# Altium PCB PCB1.PcbDoc
Units mm, origin at the board's own origin, x right, y up, seen from the top; angles counter-clockwise.
Board outline 85 x 70 mm, 2 copper layers (Top Layer, Bottom Layer); 91 components, 72 nets, 366 pads, 207 vias.
Unrouted connection lines stored in the file: 22.
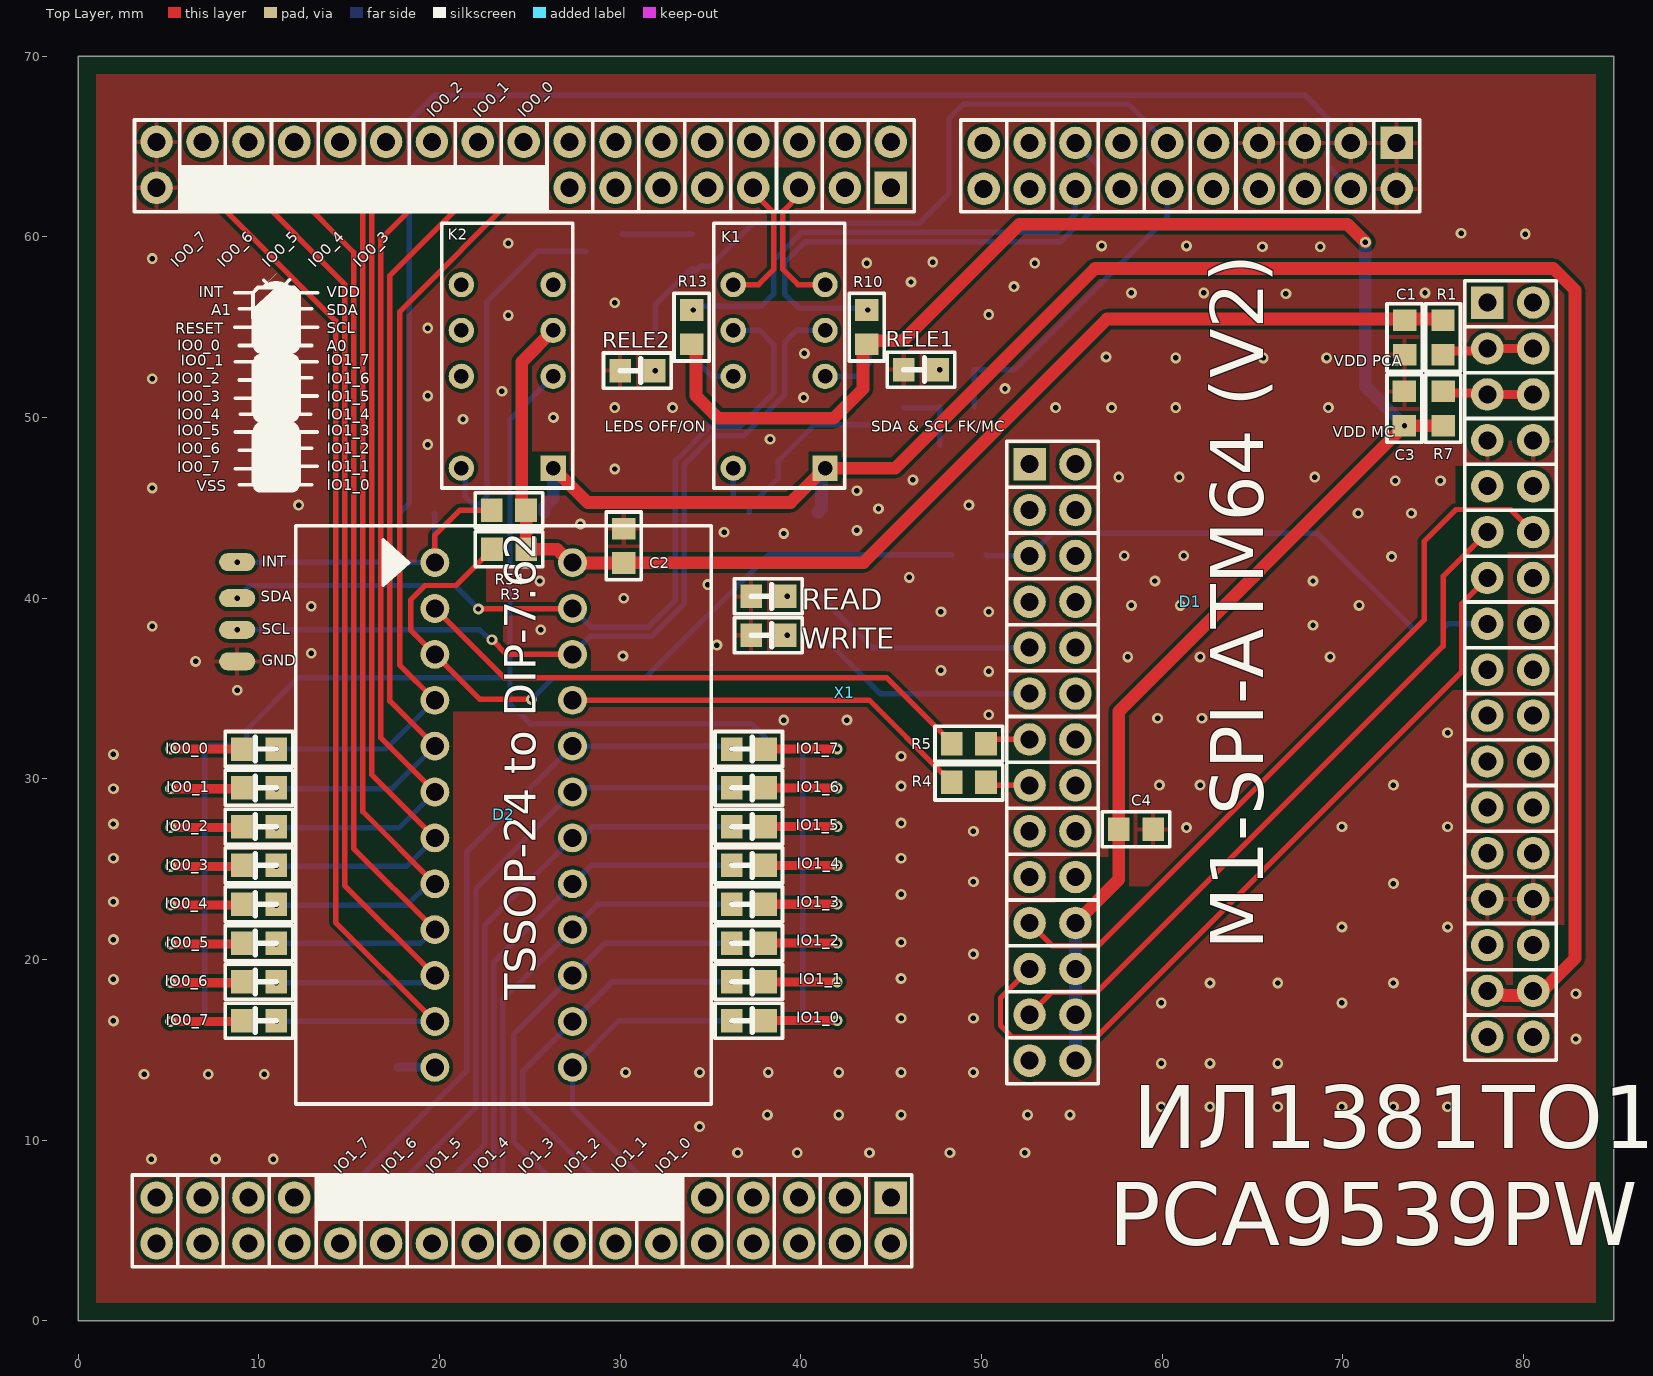
[diagram p0: Top Layer view]
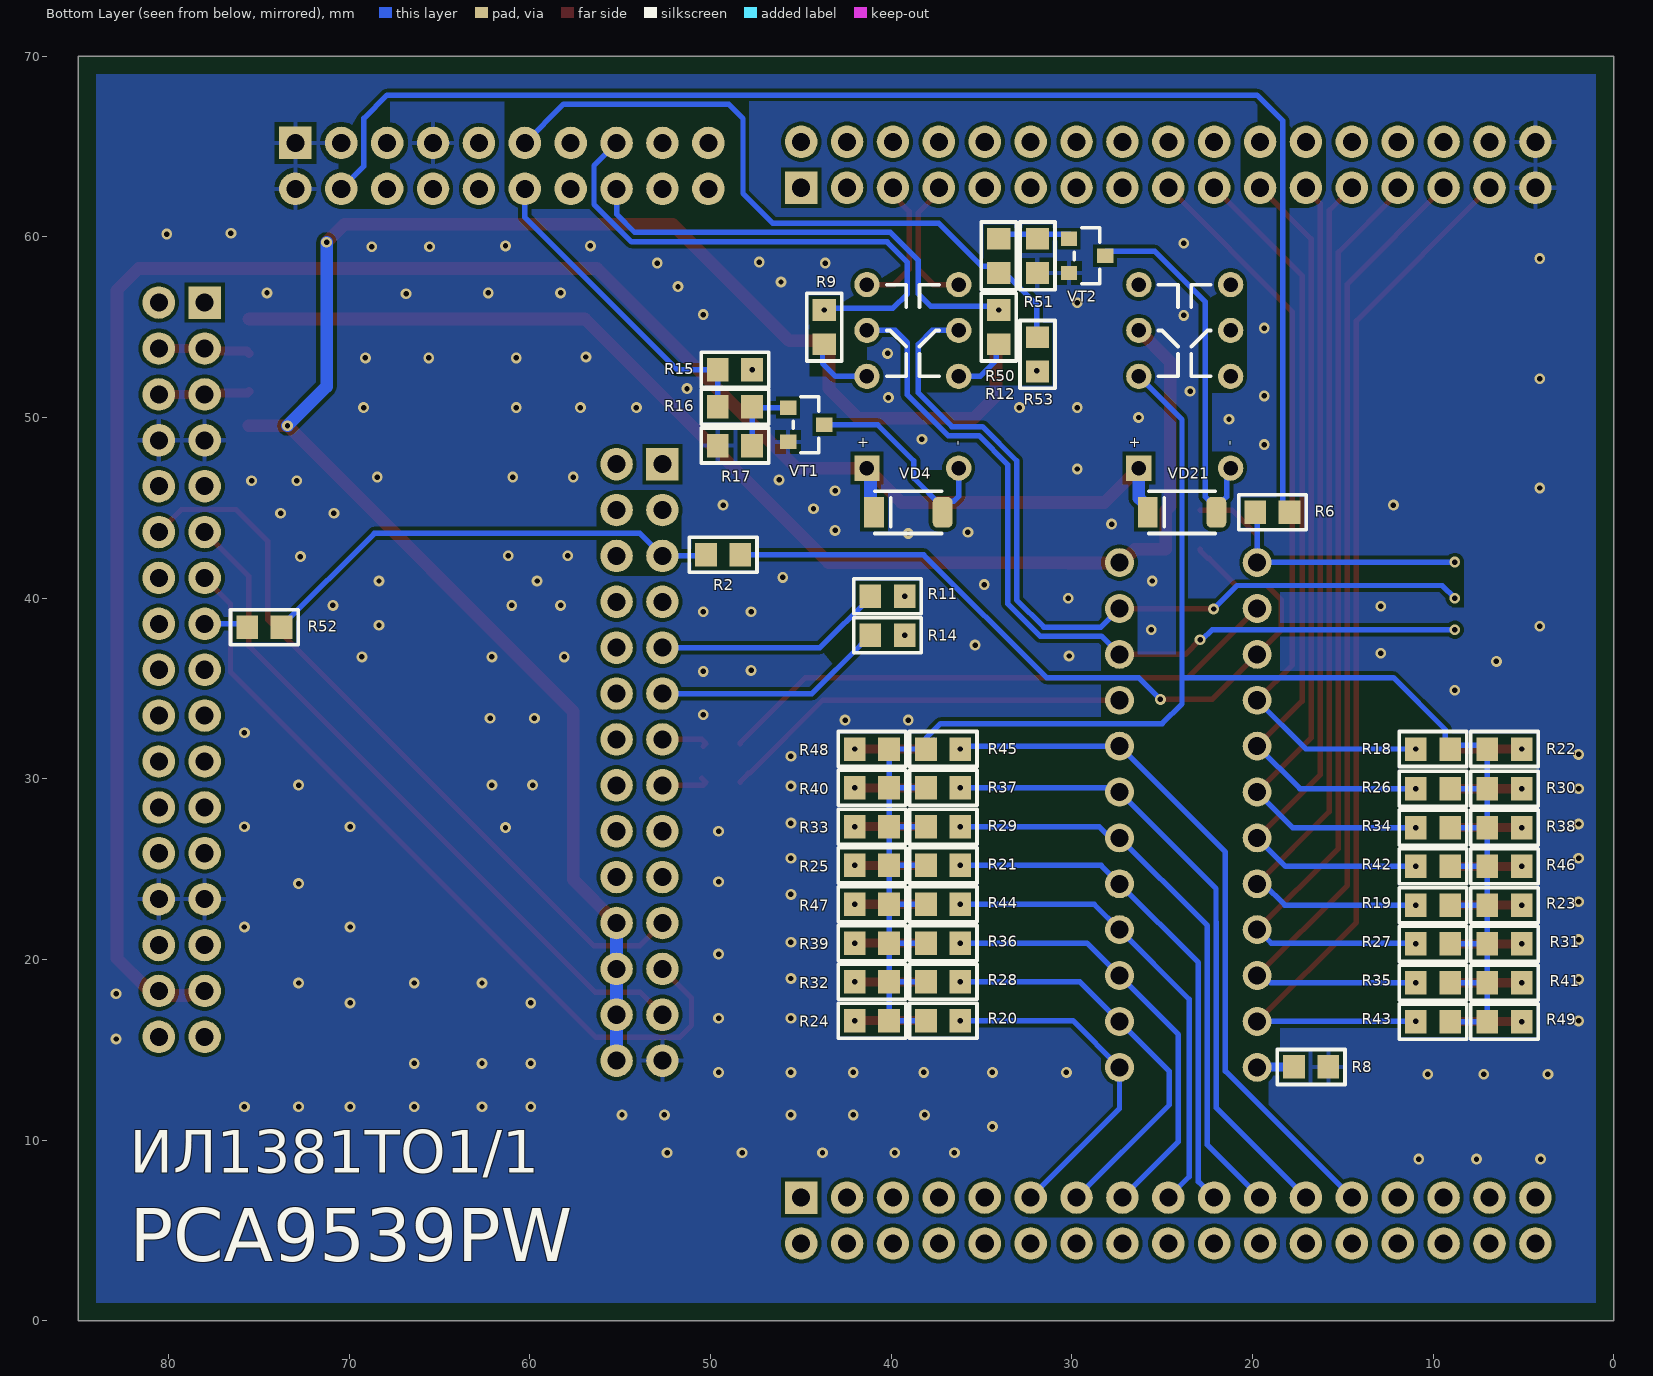
[diagram p1: Bottom Layer view, seen from below]

## Layer stack, top to bottom
Top Solder: solder mask 0.0102, Solder Resist, Dk 3.5
Top Layer: signal copper 0.0356
Dielectric 1: dielectric 0.32, FR-4, Dk 4.8
Bottom Layer: signal copper 0.0356
Bottom Solder: solder mask 0.0102, Solder Resist, Dk 3.5

## Board outline
0,0 85,0 85,70 0,70

## Design rules (kind name [scope] priority, off if disabled: settings)
Clearance [All] p1: gap=0.2 ignorepadtopadclearanceinfootprint=FALSE except(0: Arc-Hole Track-Hole SMDPad-Hole THPad-Hole Via-Hole Fill-Hole Poly-Hole Region-Hole Text-Hole)
ComponentClearance [All] p1: gap=0 collisioncheckmode=3 verticalgap=0 showdistances=FALSE
PolygonConnect [InNet('GND')] p1: thpad.connectstyle=Relief thpad.reliefconductorwidth=0.254 thpad.reliefentries=4 thpad.polygonreliefangle="90 Angle" thpad.airgapwidth=0.254 smdpad.connectstyle=Relief smdpad.reliefconductorwidth=0.254 smdpad.reliefentries=4 smdpad.polygonreliefangle="90 Angle" smdpad.airgapwidth=0.254 via.connectstyle=Direct via.reliefconductorwidth=0.254 via.reliefentries=4 via.polygonreliefangle="90 Angle" via.airgapwidth=0.254
RoutingVias [All] p1: holewidth=0.3 width=0.6 viastyle="Through Hole" minholewidth=0.3 minwidth=0.6 maxholewidth=1.2 maxwidth=2.4
SilkToSilkClearance [All] p1: silktosilkclearance=0
SilkToSolderMaskClearance [IsPad] p1: minsilkscreentomaskgap=0 clearancetoexposedcopper=TRUE
SolderMaskExpansion [All] p1: expansion=0.102 istentingtop=FALSE
Width [All] p1: maxlimit=1.2 minlimit=0.3 preferedwidth=0.3
27 further rules are at their usual default settings.

## Components (designator, comment, footprint, x,y, rotation, side; value= is the part's Value field where it differs from the comment)
C1 "10uF" 0805 73.419,54.432 r270 top
C2 "0.1uF" 0805 30.2,42.9 r90 top
C3 "10uF" 0805 73.414,50.498 r90 top
C4 "0.1uF" 0805 58.55,27.2 r0 top
D1 "M1-SPI-ATM64(V2)" M1-SPI-ATM64(V2) 61.55,39.8 r270 top locked
D2 "PCA9539PW (TSSOP-24)" "PCA9539 (TSSSOP-24 ZIF)" 23.55,28 r0 top locked
GND "Contact" Contact 8.8,36.5 r180 top (schematic designator KP4)
INT "Contact" Contact 8.8,42 r180 top (schematic designator KP1)
IO0_0 "LED(0805)" 0805(LED) 10.006,31.65 r0 top (schematic designator VD5)
IO0_1 "LED(0805)" 0805(LED) 10.006,29.502 r0 top (schematic designator VD9)
IO0_2 "LED(0805)" 0805(LED) 10.006,27.354 r0 top (schematic designator VD13)
IO0_3 "LED(0805)" 0805(LED) 10.006,25.206 r0 top (schematic designator VD17)
IO0_4 "LED(0805)" 0805(LED) 10.006,23.058 r0 top (schematic designator VD6)
IO0_5 "LED(0805)" 0805(LED) 10.006,20.91 r0 top (schematic designator VD10)
IO0_6 "LED(0805)" 0805(LED) 10.006,18.762 r0 top (schematic designator VD14)
IO0_7 "LED(0805)" 0805(LED) 10.006,16.614 r0 top (schematic designator VD18)
IO1_0 "LED(0805)" 0805(LED) 37.117,16.614 r180 top (schematic designator VD7)
IO1_1 "LED(0805)" 0805(LED) 37.117,18.762 r180 top (schematic designator VD11)
IO1_2 "LED(0805)" 0805(LED) 37.117,20.91 r180 top (schematic designator VD15)
IO1_3 "LED(0805)" 0805(LED) 37.117,23.058 r180 top (schematic designator VD19)
IO1_4 "LED(0805)" 0805(LED) 37.117,25.206 r180 top (schematic designator VD8)
IO1_5 "LED(0805)" 0805(LED) 37.117,27.354 r180 top (schematic designator VD12)
IO1_6 "LED(0805)" 0805(LED) 37.117,29.502 r180 top (schematic designator VD16)
IO1_7 "LED(0805)" 0805(LED) 37.117,31.65 r180 top (schematic designator VD20)
K1 "V23079A1001B301 TE" V23079A1001B301 38.8,53.5 r90 top locked
K2 "V23079A1001B301 TE" V23079A1001B301 23.75,53.5 r90 top locked
R1 "1" 0805 75.546,54.427 r90 top
R2 "1" 0805 49.3,42.4 r180 bottom
R3 "10k" 0805 23.85,42.7 r0 top
R4 "1" 0805 49.3,29.8 r0 top
R5 "1" 0805 49.3,31.95 r0 top
R6 "1" 0805 18.9,44.75 r0 bottom
R7 "1" 0805 75.55,50.5 r270 top
R8 "1" 0805 16.75,14.05 r0 bottom
R9 "100" 0805 43.7,55 r90 bottom
R10 "10k" 0805 43.65,55 r270 top
R11 "2.2k" 0805 40.2,40.1 r180 bottom
R12 "100" 0805 34.05,55 r90 bottom
R13 "10k" 0805 33.95,55 r270 top
R14 "2.2k" 0805 40.2,37.95 r180 bottom
R15 "2.2k" 0805 48.65,52.65 r180 bottom
R16 "4.7k" 0805 48.65,50.6 r180 bottom
R17 "20k" 0805 48.65,48.45 r0 bottom
R18 "100k" 0805 10.006,31.65 r0 bottom
R19 "100k" 0805 10.006,23.008 r0 bottom
R20 "100k" 0805 37.117,16.614 r180 bottom
R21 "100k" 0805 37.117,25.206 r180 bottom
R22 "2.2k" 0805 6.051,31.65 r180 bottom
R23 "2.2k" 0805 6.051,23.008 r180 bottom
R24 "2.2k" 0805 41.067,16.614 r0 bottom
R25 "2.2k" 0805 41.067,25.206 r0 bottom
R26 "100k" 0805 10.006,29.452 r0 bottom
R27 "100k" 0805 10.006,20.86 r0 bottom
R28 "100k" 0805 37.117,18.762 r180 bottom
R29 "100k" 0805 37.117,27.354 r180 bottom
R30 "2.2k" 0805 6.051,29.452 r180 bottom
R31 "2.2k" 0805 6.051,20.86 r180 bottom
R32 "2.2k" 0805 41.067,18.762 r0 bottom
R33 "2.2k" 0805 41.067,27.354 r0 bottom
R34 "100k" 0805 10.006,27.304 r0 bottom
R35 "100k" 0805 10.006,18.712 r0 bottom
R36 "100k" 0805 37.117,20.91 r180 bottom
R37 "100k" 0805 37.117,29.502 r180 bottom
R38 "2.2k" 0805 6.051,27.304 r180 bottom
R39 "2.2k" 0805 41.067,20.91 r0 bottom
R40 "2.2k" 0805 41.067,29.502 r0 bottom
R41 "2.2k" 0805 6.051,18.712 r180 bottom
R42 "100k" 0805 10.006,25.156 r0 bottom
R43 "100k" 0805 10.006,16.564 r0 bottom
R44 "100k" 0805 37.117,23.058 r180 bottom
R45 "100k" 0805 37.117,31.65 r180 bottom
R46 "2.2k" 0805 6.051,25.156 r180 bottom
R47 "2.2k" 0805 41.067,23.058 r0 bottom
R48 "2.2k" 0805 41.067,31.65 r0 bottom
R49 "2.2k" 0805 6.051,16.564 r180 bottom
R50 "4.7k" 0805 34.05,58.95 r90 bottom
R51 "20k" 0805 31.9,58.95 r270 bottom
R52 "1" 0805 74.7,38.4 r0 bottom
R53 "2.2k" 0805 31.9,53.5 r270 bottom
R54 "10k" 0805 23.839,44.858 r0 top
READ "LED(0805)" 0805(LED) 38.2,40.1 r180 top (schematic designator VD1)
RELE1 "LED(0805)" 0805(LED) 46.647,52.65 r180 top (schematic designator VD3)
RELE2 "LED(0805)" 0805(LED) 30.95,52.6 r180 top (schematic designator VD22)
SCL "Contact" Contact 8.8,38.25 r180 top (schematic designator KP2)
SDA "Contact" Contact 8.8,40 r180 top (schematic designator KP3)
VD4 "LL4148 NXP" SOD80C 39.05,44.75 r0 bottom
VD21 "LL4148 NXP" SOD80C 23.9,44.75 r0 bottom
VT1 "MMBT5551L" SOT-23 44.7,49.6 r270 bottom
VT2 "MMBT5551L" SOT-23 29.15,58.95 r270 bottom
WRITE "LED(0805)" 0805(LED) 38.2,37.95 r180 top (schematic designator VD2)
X1 "FORMULA" FORMULA 32.8,33.5 r0 top locked

## Footprints (in the part's own frame and the unit in brackets; to place one, negate y for a bottom-side part, rotate by r counter-clockwise, add the part's x,y. Pads: shape width x height; smd on the part's side, far side on the other; paste and mask are expansions set on the pad)
0805 [mm]
  rect 1.2x1.3 smd: 1(-0.95,0) 2(0.95,0)
  silkscreen extent -1.87,-0.97 1.87,0.97, body extent -1.05,-0.63 0.95,0.63, height 0.55
0805(LED) [mm]
  rect 1.2x1.3 smd: 1(-0.95,0) 2(0.95,0)
  silkscreen extent -1.87,-0.97 1.87,0.97, body extent -1.03,-0.41 1.03,0.5, height 0.85
Contact [mm]
  oval 2x1 smd: 1(0,0)
FORMULA [mm]
  rect 1.8x1.8 hole 1: 1(12.18,29.22) VDDF(12.18,-26.68) VEEF(45.2,22.86)
  round 1.8 hole 1: 2(9.64,29.22) 3(7.1,29.22) 4(4.56,29.22) 5(2.02,29.22) 6(-0.52,29.22) 7(-3.06,29.22) 8(-5.6,29.22) 9(-8.14,29.22) 10(-10.68,29.22) 11(-13.22,29.22) 12(-15.76,29.22) 13(-18.3,29.22) 14(-20.84,29.22) 15(-23.38,29.22) 16(-25.92,29.22) 17(12.18,31.76) 18(9.64,31.76) 19(7.1,31.76) 20(4.56,31.76) 21(2.02,31.76) 22(-0.52,31.76) 23(-3.06,31.76) 24(-5.6,31.76) 25(-8.14,31.76) 26(-10.68,31.76) 27(-13.22,31.76) 28(-15.76,31.76) 29(-18.3,31.76) 30(-20.84,31.76) 31(-23.38,31.76) 32(-25.92,31.76) 33(-28.46,-29.22) 34(-25.92,-29.22) 35(-23.38,-29.22) 36(-20.84,-29.22) 37(-18.3,-29.22) 38(-15.76,-29.22) 39(-13.22,-29.22) 40(-10.68,-29.22) 41(-8.14,-29.22) 42(-5.6,-29.22) 43(-3.06,-29.22) 44(-0.52,-29.22) 45(2.02,-29.22) 46(4.56,-29.22) 47(7.1,-29.22) 48(9.64,-29.22) 49(-28.46,-26.68) 50(-25.92,-26.68) 51(-23.38,-26.68) 52(-20.84,-26.68) 53(-18.3,-26.68) 54(-15.76,-26.68) 55(-13.22,-26.68) 56(-10.68,-26.68) 57(-8.14,-26.68) 58(-5.6,-26.68) 59(-3.06,-26.68) 60(-0.52,-26.68) 61(2.02,-26.68) 62(4.56,-26.68) 63(7.1,-26.68) 64(9.64,-26.68) +5V(45.2,-15.24) +5V(47.74,-15.24) +5V_VCCF(45.2,20.32) +5V_VCCS(47.74,20.32) +5V_VDDF(45.2,17.78) +5V_VDDS(47.74,17.78) +12V(45.2,-12.7) +12V(47.74,-12.7) -12V(45.2,-17.78) -12V(47.74,-17.78) GND(-28.46,29.22) GND(-28.46,31.76) GND(45.2,-10.16) GND(45.2,15.24) GND(47.74,-10.16) GND(47.74,15.24) IN-OUT1(47.74,10.16) IN-OUT2(47.74,7.62) IN-OUT3(47.74,5.08) IN-OUT4(47.74,2.54) IN-OUT5(47.74,0) IN-OUT6(47.74,-2.54) IN-OUT7(47.74,-5.08) IN-OUT8(47.74,-7.62) NC(45.2,12.7) NC(47.74,12.7) OUT1(45.2,10.16) OUT2(45.2,7.62) OUT3(45.2,5.08) OUT4(45.2,2.54) OUT5(45.2,0) OUT6(45.2,-2.54) OUT7(45.2,-5.08) OUT8(45.2,-7.62) VDDS(12.18,-29.22) VEES(47.74,22.86)
  silkscreen extent -29.8,-30.51 49.02,32.97, body extent -29.79,-30.4 48.98,32.92, height 2
M1-SPI-ATM64(V2) [mm]
  rect 1.8x1.8 hole 1: 1X2(-25.4,11.43) 1X3(-7.62,-8.89)
  round 1.8 hole 1: 2X2(-22.86,11.43) 2X3(-7.62,-6.35) 3X2(-25.4,8.89) 3X3(-5.08,-8.89) 4X2(-22.86,8.89) 4X3(-5.08,-6.35) 5X2(-25.4,6.35) 5X3(-2.54,-8.89) 6X2(-22.86,6.35) 6X3(-2.54,-6.35) 7X2(-25.4,3.81) 7X3(0,-8.89) 8X2(-22.86,3.81) 8X3(0,-6.35) 9X2(-25.4,1.27) 9X3(2.54,-8.89) 10X2(-22.86,1.27) 10X3(2.54,-6.35) 11X2(-25.4,-1.27) 11X3(5.08,-8.89) 12X2(-22.86,-1.27) 12X3(5.08,-6.35) 13X2(-25.4,-3.81) 13X3(7.62,-8.89) 14X2(-22.86,-3.81) 14X3(7.62,-6.35) 15X2(-25.4,-6.35) 15X3(10.16,-8.89) 16X2(-22.86,-6.35) 16X3(10.16,-6.35) 17X2(-25.4,-8.89) 17X3(12.7,-8.89) 18X2(-22.86,-8.89) 18X3(12.7,-6.35) 19X2(-25.4,-11.43) 19X3(15.24,-8.89) 20X2(-22.86,-11.43) 20X3(15.24,-6.35) 21X3(17.78,-8.89) 22X3(17.78,-6.35) 23X3(20.32,-8.89) 24X3(20.32,-6.35) 25X3(22.86,-8.89) 26X3(22.86,-6.35) 27X3(25.4,-8.89) 28X3(25.4,-6.35)
  silkscreen extent -26.67,-12.7 26.67,12.7
"PCA9539 (TSSSOP-24 ZIF)" [mm]
  round 1.6 hole 1: 1(-3.81,13.97) 2(-3.81,11.43) 3(-3.81,8.89) 4(-3.81,6.35) 5(-3.81,3.81) 6(-3.81,1.27) 7(-3.81,-1.27) 8(-3.81,-3.81) 9(-3.81,-6.35) 10(-3.81,-8.89) 11(-3.81,-11.43) 12(-3.81,-13.97) 13(3.81,-13.97) 14(3.81,-11.43) 15(3.81,-8.89) 16(3.81,-6.35) 17(3.81,-3.81) 18(3.81,-1.27) 19(3.81,1.27) 20(3.81,3.81) 21(3.81,6.35) 22(3.81,8.89) 23(3.81,11.43) 24(3.81,13.97)
  silkscreen extent -11.5,-16 11.5,16, body extent -5.04,-15.21 5.06,15.41, height 8.5
SOD80C [mm]
  rrect50% 1.1x1.7 smd: 1(-1.9,0)
  rect 1.1x1.7 smd: 2(1.9,0)
  silkscreen extent -1.85,-1.17 1.85,1.17, body extent -1.9,-0.8 1.8,0.8, height 1.55
SOT-23 [mm]
  rect 0.8x0.9 smd: 1(-0.95,-1) 1(-0.95,-1) 2(0.95,-1) 2(0.95,-1) 3(0,1) 3(0,1)
  silkscreen extent -1.55,-0.72 1.55,0.7, body extent -1.5,-1.25 1.5,1.25, height 1.05
V23079A1001B301 [mm]
  rect 1.4x1.4 hole 0.8: 1(-6.3,-2.54)
  round 1.4 hole 0.8: 3(-1.22,-2.54) 4(1.32,-2.54) 5(3.86,-2.54) 8(3.86,2.54) 9(1.32,2.54) 10(-1.22,2.54) 12(-6.3,2.54)
  silkscreen extent -7.4,-3.63 7.25,3.63, body extent -7.25,-3.6 7.25,3.6, height 9.9

## Part data
C1 C2 C3 C4: library part C0805, ComponentHeigt=1.3, Firme=AVX, KIND=Конденсатор, Leadform=SMD, Packaging=0805
D2: library part PCA9539PW
R1 R2 R3 R4 R5 R6 R7 R8 R9 R10 R11 R12 R13 R14 R15 R16 R17 R18 R19 R20 R21 R22 R23 R24 R25 R26 R27 R28 R29 R30 R31 R32 R33 R34 R35 R36 R37 R38 R39 R40 R41 R42 R43 R44 R45 R46 R47 R48 R49 R50 R51 R52 R53 R54: library part "R0805 Yageo", ComponentHeigt=0.6, Firme=Yageo, KIND=Резистор, Leadform=SMD, Packaging=0805
D1: ComponentHeigt=5.5, Name=Вилка, Specification="Вилка PLD2-2 *", Typ=PLD2-2
IO0_0 IO0_1 IO0_2 IO0_3 IO0_4 IO0_5 IO0_6 IO0_7 IO1_0 IO1_1 IO1_2 IO1_3 IO1_4 IO1_5 IO1_6 IO1_7 READ RELE1 RELE2 WRITE: ComponentHeigt=0.75, Firme=Kingbright, KIND="Светодиод L-1154GD Kingbright", Leadform="в отверстия", NN=24003000
VD4 VD21: Component Link=http://www.nxp.com, ComponentHeigt=1.6, Firme=NXP, KIND="Диод LL4148 NXP", Leadform=SMD, NN=24009301, Packaging=SOD-80C
VT1 VT2: ComponentHeigt=1.1, Firme=ONS, KIND="Транзистор MMBT5551L*G ONS", Leadform=SMD, NN=24007468, Packaging=SOT-23

## Via types
v1: diameter 0.6, hole 0.3, Top Layer to Bottom Layer, tented both sides, 206 vias
v2: diameter 0.6, hole 0.3, Top Layer to Bottom Layer, 1 vias

## Nets (pads, with @x,y where several pads share a name; then routed paths per layer and width w, separated by ;. In a path a pad name is that pad's centre, name@x,y a point inside that pad or via, vN(x,y) a via of type N, cw(c..) or ccw(c..) an arc to the next point about the centre after c; other vN are vias at no path point)
+5V_CONST: K1.1 K2.1 VD4.2 VD21.2 X1.+5V | length 111.3
  Top Layer w0.7: K2.1 28.195,45.295 39.435,45.295 K1.1 45.23,47.2 56.28,58.25 81.657,58.25 82.855,57.052 82.855,20.065 81.261,18.47 80.75,18.47 80.54,18.26 80.242,18.26 79.987,18.005 78.96,18.005 78.915,18.05 78.21,18.05 X1.+5V@78,18.26
  Bottom Layer w0.7: VD21.2 25.8,45.05 26.29,45.54 K2.1 ; VD4.2 41.145,44.945 41.145,47.005 K1.1
+5V_VCC: R1.1 X1.+5V_VCCF X1.+5V_VCCS | length 5.1
  Top Layer w0.5: R1.1@75.55,53.55 75.685,53.685 77.865,53.685 X1.+5V_VCCF X1.+5V_VCCS
+5V_VDD: R7.1 X1.+5V_VDDF X1.+5V_VDDS | length 5.1
  Top Layer w0.5: R7.1 75.635,51.365 77.915,51.365 X1.+5V_VDDF X1.+5V_VDDS
A0: D2.21 R4.1 | length 22.9
  Top Layer w0.3: D2.21 43.8,34.35 47.85,30.3 47.9,30.3 48.35,29.85 R4.1
A0_MC: D1.15X3 R4.2 | length 2.8
  Top Layer w0.3: R4.2@50.48,30.03 R4.2 50.41,29.64 D1.15X3
A1: D2.2 R5.1 | length 31.7
  Top Layer w0.3: D2.2 23.57,35.6 44.75,35.6 48.35,32 R5.1
A1_MC: D1.13X3 R5.2 | length 2.7
  Top Layer w0.3: R5.2@50.41,31.79 R5.2 50.48,32.18 D1.13X3
DI1_MC: D1.21X3 X1.IN-OUT1 | length 41.5
  Top Layer w0.3: D1.21X3 53.91,20.77 56.47,20.77 74.5,38.8 74.5,43.15 76.26,44.91 79.29,44.91 X1.IN-OUT1
DO1_MC: D1.25X3 X1.OUT1 | length 38.7
  Top Layer w0.3: D1.25X3 53.91,18.19 56.39,18.19 75.55,37.35 75.55,41.21 X1.OUT1
DO2_MC: D1.23X3 X1.OUT2 | length 43.8
  Top Layer w0.3: D1.23X3 51.05,17.87 51.05,16.35 51.71,15.69 56.34,15.69 76.57,35.92 76.57,39.69 X1.OUT2
GND: C1.2 C2.2 C3.2 C4.2 D1.1X2 D1.2X2 D1.3X2 D1.5X2 D1.7X2 D1.27X3 GND.1 R8.1 R17.2 R51.2 READ.2 RELE1.2 RELE2.2 VT1.2 VT2.2 WRITE.2 X1.GND
  other v1: 4.05,8.95 7.6,8.95 10.8,8.95 36.5,9.3 39.8,9.3 43.8,9.3 48.25,9.3 52.4,9.3 34.4,10.75 38.15,11.4 42.1,11.4 45.55,11.4 52.55,11.4 54.9,11.4 59.95,11.85 62.65,11.85 66.4,11.85 69.95,11.85 72.8,11.85 75.8,11.85 3.65,13.65 7.2,13.65 10.3,13.65 30.3,13.75 34.4,13.75 38.2,13.75 42.1,13.75 45.55,13.75 49.55,13.75 59.95,14.25 62.65,14.25 66.4,14.25 82.9,15.6 1.95,16.6 45.55,16.75 49.55,16.75 59.95,17.6 69.95,17.6 82.9,18.1 62.65,18.7 66.4,18.7 72.8,18.7 1.95,18.9 45.55,18.95 49.55,20.3 45.55,20.95 1.95,21.1 69.95,21.8 75.8,21.8 1.95,23.2 45.55,23.6 72.8,24.2 49.55,24.3 1.95,25.6 45.55,25.6 49.55,27.1 61.35,27.3 69.95,27.35 75.8,27.35 1.95,27.5 45.55,27.55 1.95,29.45 45.55,29.6 59.85,29.65 62.1,29.65 72.8,29.65 45.55,31.25 1.95,31.35 75.8,32.55 39.05,33.25 42.55,33.25 59.75,33.35 62.2,33.35 50.4,33.55 8.8,34.9 50.4,35.95 47.75,36 6.5,36.5 58.1,36.75 62.1,36.75 69.3,36.75 30.15,36.8 12.9,36.95 35.35,37.4 25.6,38.25 4.1,38.45 68.35,38.5 47.75,39.25 50.4,39.25 12.9,39.55 58.3,39.6 61,39.6 70.9,39.6 30.2,40 34.85,40.75 25.55,40.95 59.6,40.95 68.35,40.95 46,41.15 72.7,42.3 57.9,42.35 61.2,42.35 39.05,43.58 35.75,43.65 43.1,43.75 27.8,44.1 70.85,44.7 73.8,44.7 44.3,44.95 12.2,45.15 49.3,45.15 43.1,45.95 4.1,46.1 72.9,46.5 75.4,46.5 46.2,46.55 57.6,46.7 60.95,46.7 68.45,46.7 29.7,47.15 19.35,48.5 38.3,48.8 21.3,49.9 26.3,50 29.7,50.55 32.9,50.55 54.1,50.55 57.2,50.55 60.75,50.55 69.2,50.55 40.15,51.1 19.35,51.2 23.45,51.45 51.3,51.6 4.1,52.15 60.75,53.3 65.6,53.3 69.1,53.3 56.9,53.35 40.2,53.55 19.35,54.95 23.8,55.65 50.4,55.7 29.7,56.35 66.85,56.85 58.3,56.9 62.3,56.9 74.55,56.9 51.8,57.25 46.1,57.5 43.65,58.55 52.95,58.55 47.3,58.6 4.1,58.8 65.55,59.45 68.75,59.45 56.65,59.5 61.35,59.5 23.8,59.65 80.1,60.15 76.55,60.2
INT_MC: D1.4X2 R6.1 | length 78.3
  Bottom Layer w0.3: R6.1@17.8,44.7 17.8,44.75 18.33,45.28 18.33,66.43 19.75,67.85 22.842,67.85 67.9,67.85 69.19,66.56 69.19,63.91 D1.4X2
INT_PCA: D2.1 INT.1 R6.2 R54.1 | length 18.9
  Top Layer w0.3: D2.1 19.74,43.49 21.108,44.858 R54.1
  Bottom Layer w0.3: v1@8.815,41.985 D2.1@19.725,41.985 ; R6.2@19.7,44.7 19.74,44.66 D2.1
  Bottom Layer w0.5: v1(8.8,42) v1@8.815,41.985 ; D2.1@19.725,41.985 D2.1
IO0_0: D2.4 IO0_0.2 R18.2 X1.9 | length 41.9
  Top Layer w0.3: D2.4 17.79,36.3 17.79,55.85 X1.9
  Bottom Layer w0.3: v1(10.956,31.65) 17.04,31.65 D2.4
IO0_1: D2.5 IO0_1.2 R26.2 X1.10 | length 43.7
  Top Layer w0.3: D2.5 17.25,34.3 17.25,57.85 X1.10
  Bottom Layer w0.3: v1(10.956,29.452) 17.382,29.452 D2.5
IO0_2: D2.6 IO0_2.2 R34.2 X1.11 | length 45.5
  Top Layer w0.3: X1.11 16.75,59.89 16.75,32.26 D2.6
  Bottom Layer w0.3: v1(10.956,27.304) 17.774,27.304 D2.6
IO0_3: D2.7 IO0_3.2 R42.2 X1.12 | length 47.2
  Top Layer w0.3: X1.12 17.04,62.639 16.25,61.849 16.25,30.22 D2.7
  Bottom Layer w0.3: v1(10.956,25.156) 18.166,25.156 D2.7
IO0_4: D2.8 IO0_4.2 R19.2 X1.13 | length 50
  Top Layer w0.3: X1.13 15.75,61.47 15.75,28.18 D2.8
  Bottom Layer w0.3: v1(10.956,23.008) 18.206,23.008 19.388,24.19 D2.8
IO0_5: D2.9 IO0_5.2 R27.2 X1.14 | length 53.4
  Top Layer w0.3: X1.14 11.96,62.438 15.25,59.148 15.25,26.14 D2.9
  Bottom Layer w0.3: v1(10.956,20.86) 11.006,20.91 18.961,20.91 19.701,21.65 D2.9
IO0_6: D2.10 IO0_6.2 R35.2 X1.15 | length 56.8
  Top Layer w0.3: X1.15 14.75,57.39 14.75,24.1 D2.10
  Bottom Layer w0.3: v1(10.956,18.712) 18.99,18.712 19.388,19.11 D2.10
IO0_7: D2.11 IO0_7.2 R43.2 X1.16 | length 60.3
  Top Layer w0.3: X1.16 14.25,55.35 14.25,22.06 D2.11
  Bottom Layer w0.3: v1(10.956,16.57) D2.11
IO1_0: D2.13 IO1_0.2 R20.2 X1.60 | length 19.1
  Bottom Layer w0.3: X1.60 27.36,11.74 27.36,13.43 D2.13 29.944,16.614 v1(36.167,16.614)
IO1_1: D2.14 IO1_1.2 R28.2 X1.59 | length 22.7
  Bottom Layer w0.3: X1.59 24.6,11.96 24.6,13.81 29.552,18.762 v1(36.167,18.762)
IO1_2: D2.15 IO1_2.2 R36.2 X1.58 | length 24.5
  Bottom Layer w0.3: X1.58 24.1,9.92 24.1,15.85 29.16,20.91 v1(36.167,20.91)
IO1_3: D2.16 IO1_3.2 R44.2 X1.57 | length 26.3
  Bottom Layer w0.3: X1.57 23.5,7.98 23.5,17.79 D2.16 28.768,23.058 v1(36.167,23.058)
IO1_4: D2.17 IO1_4.2 R21.2 X1.56 | length 28.8
  Bottom Layer w0.3: X1.56 23,7.7 23,19.83 D2.17 28.376,25.206 v1(36.167,25.206)
IO1_5: D2.18 IO1_5.2 R29.2 X1.55 | length 32.2
  Bottom Layer w0.3: X1.55 22.5,9.74 22.5,21.87 27.609,26.979 28.114,26.979 28.49,27.354 v1(36.167,27.354)
IO1_6: D2.19 IO1_6.2 R37.2 X1.54 | length 35.6
  Bottom Layer w0.3: X1.54 22,11.78 22,22.077 22.02,22.097 22.02,23.93 27.592,29.502 v1(36.167,29.502)
IO1_7: D2.20 IO1_7.2 R45.2 X1.53 | length 39.2
  Bottom Layer w0.3: X1.53 21.5,13.82 21.5,25.95 27.2,31.65 D2.20 36.007,31.81 v1(36.167,31.65)
LED_READ: D1.9X3 R11.1 | length 12.7
  Bottom Layer w0.3: R11.1 41.15,40.05 43.94,37.26 D1.9X3
LED_WRITE: D1.11X3 R14.1 | length 12.9
  Bottom Layer w0.3: R14.1 41.15,37.9 41.6,37.45 41.65,37.45 44.38,34.72 D1.11X3
NetD2_12: D2.12 R8.2 | length 2
  Bottom Layer w0.5: R8.2 17.71,14.04 19.73,14.04 D2.12
NetK1_3: K1.3 R9.1 | length 3.8
  Bottom Layer w0.3: K1.3 43.08,52.28 43.8,53 R9.1@43.8,54.05
NetK1_10: K1.10 R12.1 | length 3.4
  Bottom Layer w0.3: R12.1@34.1,54.05 34.174,53.976 34.174,53.176 35.07,52.28 K1.10
NetK1_12: K1.12 VD4.1 VT1.3 | length 12
  Bottom Layer w0.3: K1.12 36.26,45.64 36.527,45.373 36.76,45.373 VD4.1@37.15,44.982 ; VD4.1 37.15,45.05 38.75,46.65 38.75,47.6 40.75,49.6 VT1.3@43.7,49.6
NetK2_12: K2.12 VD21.1 VT2.3 | length 21.1
  Bottom Layer w0.3: K2.12 21.21,46.902 21.424,46.688 21.424,45.626 22,45.05 22,45.003 22.623,45.626 22.623,56.423 25.4,59.2 VT2.3@28.1,59.2 ; VD21.1 VD21.1@22,44.982
NetR11_2: R11.2 READ.1
  other v1: 39.25,40.1
NetR14_2: R14.2 WRITE.1
  other v1: 39.25,37.95
NetR15_2: R15.2 RELE1.1
  other v1: 47.7,52.65
NetR16_2: R16.2 R17.1 VT1.1 | length 4.2
  Bottom Layer w0.3: VT1.1@45.7,50.55 47.65,50.55 R16.2 R17.1
NetR22_2: IO0_0.1 R22.2 | length 4
  Top Layer w0.5: v1(5.101,31.65) IO0_0.1
NetR23_2: IO0_4.1 R23.2 | length 4
  Top Layer w0.5: v1(5.101,23.008) 9.006,23.008 IO0_4.1
NetR24_2: IO1_0.1 R24.2 | length 4
  Top Layer w0.5: IO1_0.1 v1(42.017,16.614)
NetR25_2: IO1_4.1 R25.2 | length 4
  Top Layer w0.5: IO1_4.1 v1(42.017,25.206)
NetR30_2: IO0_1.1 R30.2 | length 4
  Top Layer w0.5: v1(5.101,29.452) 9.006,29.452 IO0_1.1
NetR31_2: IO0_5.1 R31.2 | length 4
  Top Layer w0.5: v1(5.101,20.86) 9.006,20.86 IO0_5.1
NetR32_2: IO1_1.1 R32.2 | length 4
  Top Layer w0.5: IO1_1.1 v1(42.017,18.762)
NetR33_2: IO1_5.1 R33.2 | length 4
  Top Layer w0.5: IO1_5.1 v1(42.017,27.354)
NetR38_2: IO0_2.1 R38.2 | length 4
  Top Layer w0.5: v1(5.101,27.304) 9.006,27.304 IO0_2.1
NetR39_2: IO1_2.1 R39.2 | length 4
  Top Layer w0.5: IO1_2.1 v1(42.017,20.91)
NetR40_2: IO1_6.1 R40.2 | length 4
  Top Layer w0.5: IO1_6.1 v1(42.017,29.502)
NetR41_2: IO0_6.1 R41.2 | length 4
  Top Layer w0.5: v1(5.101,18.712) 9.006,18.712 IO0_6.1
NetR46_2: IO0_3.1 R46.2 | length 4
  Top Layer w0.5: v1(5.101,25.156) 9.006,25.156 IO0_3.1
NetR47_2: IO1_3.1 R47.2 | length 4
  Top Layer w0.5: IO1_3.1 v1(42.017,23.058)
NetR48_2: IO1_7.1 R48.2 | length 4
  Top Layer w0.5: IO1_7.1 v1(42.017,31.65)
NetR49_2: IO0_7.1 R49.2 | length 4
  Top Layer w0.5: v1(5.101,16.564) 9.006,16.564 IO0_7.1
NetR50_2: R50.2 R51.1 VT2.1 | length 3.9
  Bottom Layer w0.3: VT2.1@30.1,60.15 31.85,60.15 R50.2@34,60.15
NetR53_2: R53.2 RELE2.1
  other v2: 31.95,52.6
RELE1: D1.12X2 R15.1 R16.1 | length 17.8
  Bottom Layer w0.3: R16.1 R15.1 51.85,52.65 60.28,61.08 D1.12X2
RELE2: D1.11X2 R50.1 R53.1 | length 38.2
  Bottom Layer w0.3: R53.1@31.95,54.45 31.95,56.25 33.95,58.25 34,58.25 R50.1@34.05,58.25 ; R50.1 34.418,58.368 34.968,58.368 37.35,60.75 46.55,60.75 48.2,62.4 48.2,66.55 49,67.35 58.13,67.35 D1.11X2
RESET_PCA: D2.3 R2.2 R3.1 | length 42.2
  Top Layer w0.3: R3.1 22.9,42.65 22.45,42.2 22.4,42.2 20.9,40.7 19.2,40.7 18.4,39.9 18.4,38.23 D2.3 22.23,34.4 v1(25.1,34.4)
  Bottom Layer w0.3: v1(25.1,34.4) 26.3,35.6 31.4,35.6 38.2,42.4 R2.2
RST_IN: R52.2 X1.OUT3 | length 2.4
  Bottom Layer w0.3: R52.2 75.83,38.58 X1.OUT3
RST_MC: D1.5X3 R2.1 R52.1 | length 26.2
  Bottom Layer w0.3: R2.1 50.31,42.34 D1.5X3 53.91,43.59 68.61,43.59 73.75,38.45 R52.1
SCL_F: K1.5 X1.3 | length 7.6
  Top Layer w0.3: X1.3 39.9,62.314 39,61.414 39,58.2 39.84,57.36 K1.5
SCL_MC: D1.15X2 R9.2 R10.1 | length 29.4
  Bottom Layer w0.3: R9.2@43.8,55.95 43.7,56.05 39.9,56.05 39.1,56.85 39.1,58.593 40.228,59.721 54.371,59.721 56.45,61.8 56.45,63.95 D1.15X2
  other v1: 43.7,55.95
SCL_PCA: D2.22 K1.4 SCL.1 | length 46.7
  Top Layer w0.3: v1(22.9,37.7) 23.71,36.89 D2.22
  Bottom Layer w0.3: v1(8.8,38.25) 22.239,38.25 22.789,37.7 v1(22.9,37.7) ; D2.22 28.37,37.9 31.75,37.9 33.55,39.7 33.55,47.4 35.15,49 36.85,49 39.1,51.25 39.1,54.15 39.77,54.82 K1.4
SDA_F: K1.8 X1.4 | length 7.6
  Top Layer w0.3: K1.8 37.66,57.36 38.5,58.2 38.5,61.344 37.36,62.484 X1.4
SDA_MC: D1.16X2 R12.2 R13.1 | length 25.8
  Bottom Layer w0.3: v1(34.05,55.95) 34.25,56.15 37.8,56.15 38.5,56.85 38.5,58.7 40.05,60.25 54.193,60.25 55.2,61.257 D1.16X2
SDA_PCA: D2.23 K1.9 SDA.1 | length 46.1
  Top Layer w0.3: v1(22.15,39.4) 22.165,39.415 27.345,39.415 D2.23
  Bottom Layer w0.3: v1(8.8,40) 9.5,40.7 20.85,40.7 v1(22.15,39.4) ; D2.23@27.35,39.44 D2.23 28.39,38.4 31.543,38.4 33.05,39.907 33.05,47.607 34.943,49.5 36.643,49.5 38.5,51.357 38.5,54.05 37.73,54.82 K1.9
VCC_MC: C3.1 C4.1 D1.22X3 D1.24X3 D1.26X3 D1.28X3 R7.2 R10.2 R13.2 | length 102.6
  Top Layer w0.7: R13.2 34.2,53.8 34.2,51.2 35.45,49.95 41.8,49.95 43.44,51.59 43.44,53.84 R10.2 ; R10.2@43.8,54.05 44,54.25 45.65,54.25 52.1,60.7 70.25,60.7 v1(71.25,59.7) ; D1.22X3 57.6,24.42 57.6,33.734 v1(73.414,49.548) ; C3.1@73.3,49.55 R7.2
  Bottom Layer w0.7: D1.22X3 D1.24X3 D1.26X3 D1.28X3 D1.28X3@55.25,14.35 ; v1(71.25,59.7) 71.25,51.712 v1(73.414,49.548)
VDD: K2.3 R18.1 R19.1 R20.1 R21.1 R22.1 R23.1 R24.1 R25.1 R26.1 R27.1 R28.1 R29.1 R30.1 R31.1 R32.1 R33.1 R34.1 R35.1 R36.1 R37.1 R38.1 R39.1 R40.1 R41.1 R42.1 R43.1 R44.1 R45.1 R46.1 R47.1 R48.1 R49.1 | length 114.9
  Bottom Layer w0.3: R22.1@7.001,31.6 R30.1 ; R22.1@7.108,31.85 9.056,31.85 9.33,32.124 9.33,32.73 12.2,35.6 23.9,35.6 ; R43.1 R49.1 R41.1 ; R35.1 R41.1 ; R27.1 R31.1 ; R19.1 R23.1 ; R42.1 R46.1 ; R34.1 R38.1 ; R26.1 R30.1 ; K2.3 23.9,49.89 23.9,35.6 ; R45.1@37.617,32.15 R45.1@38.067,31.7 ; R20.1 R24.1 R32.1 ; R28.1 R32.1 ; R36.1 R39.1 ; R44.1 R47.1 ; R21.1 R25.1 ; R29.1 R33.1 ; R37.1 R40.1 ; R41.1 R31.1 ; R31.1 R23.1 ; R23.1 R46.1 ; R46.1 R38.1 ; R38.1 R30.1 ; 23.9,35.6 23.9,34.15 25,33.05 37.267,33.05 38.067,32.25 R45.1@38.067,31.7 ; R45.1@38.067,31.7 R45.1 R48.1 R40.1 ; R32.1 R39.1 ; R39.1 R47.1 ; R47.1 R25.1 ; R25.1 R33.1 ; R33.1 R40.1
VDD_PCA: C1.1 C2.1 D2.24 K2.4 R1.2 R3.2 R54.2 | length 69.5
  Top Layer w0.7: R54.2 24.55,45.096 24.55,53.08 K2.4 ; R54.2@24.8,44.846 R3.2 26.517,42.7 27.247,41.97 D2.24 ; D2.24@27.38,41.95 C2.1 ; C2.1@30.2,41.97 32.1,41.97 43.47,41.97 56.95,55.45 73.419,55.45 R1.2@75.55,55.45
pads on no net: D1.1X3 D1.2X3 D1.3X3 D1.4X3 D1.6X2 D1.6X3 D1.7X3 D1.8X2 D1.8X3 D1.9X2 D1.10X2 D1.10X3 D1.12X3 D1.13X2 D1.14X2 D1.14X3 D1.16X3 D1.17X2 D1.17X3 D1.18X2 D1.18X3 D1.19X2 D1.19X3 D1.20X2 D1.20X3 K2.5 K2.8 K2.9 K2.10 X1.1 X1.2 X1.5 X1.6 X1.7 X1.8 X1.17 X1.18 X1.19 X1.20 X1.21 X1.22 X1.23 X1.24 X1.25 X1.26 X1.27 X1.28 X1.29 X1.30 X1.31 X1.32 X1.33 X1.34 X1.35 X1.36 X1.37 X1.38 X1.39 X1.40 X1.41 X1.42 X1.43 X1.44 X1.45 X1.46 X1.47 X1.48 X1.49 X1.50 X1.51 X1.52 X1.61 X1.62 X1.63 X1.64 X1.+12V X1.-12V X1.IN-OUT2 X1.IN-OUT3 X1.IN-OUT4 X1.IN-OUT5 X1.IN-OUT6 X1.IN-OUT7 X1.IN-OUT8 X1.NC X1.OUT4 X1.OUT5 X1.OUT6 X1.OUT7 X1.OUT8 X1.VDDF X1.VDDS X1.VEEF X1.VEES

## Polygon pours and split planes (outlines as drawn)
GND on Top Layer "NONET_L-01_P-001" (solid, remove dead copper, pour order 0): 1,69 1,1 84,1 84,69
GND on Bottom Layer "NONET_L-01_P-001" (solid, remove dead copper, pour order 1): 1,69 1,1 84,1 84,69

## Other copper
Top Layer:
  pour cut-out: 22.555,41.85 22.555,39.15 20.85,39.15
  pour cut-out: 23.5,38.21 23.5,39.415 22.165,39.415
  pour cut-out: 55.345,13.3 52.25,13.3 52.25,14.5
  pour cut-out: 51.506,14.248 51.506,15.5 52.9,15.5
  pour cut-out: 56.3,14.255 56.3,15.9 54.95,15.9
  pour cut-out: 55.345,25.66 57.6,25.66 57.6,24.42
  pour cut-out: 54.1,24.705 54.1,22.02 55.2,22.02
  pour cut-out: 58.161,24.42 58.161,23.15 56.85,23.15
  pour cut-out: 81.64,54.177 81.64,48.75 76.187,48.75
  pour cut-out: 76.4,48.75 76.4,54.889 74.696,54.889
  pour cut-out: 74.269,54.889 74.269,48.75 74.696,48.75 74.696,54.889
  pour cut-out: 27.19,48.1 24.55,48.1 24.55,45.7 27.2,45.7
  pour cut-out: 28.36,36.758 28.36,35.55 27.05,35.55
  pour cut-out: 42.8,55.15 42.8,54.811 44.5,54.811 44.5,55.15
  pour cut-out: 33.1,55.15 34.8,55.15 34.8,54.85 33.1,54.85
  pour cut-out: 19.733,41.978 23.5,38.21 23.5,36.35
  pour cut-out: 57.659,24.02 59.2,24.02 59.2,23.35
  pour cut-out: 53.76,32.325 53.76,29.64 52.66,29.64
  pour cut-out: 23.7,41.85 24.191,41.85 24.191,44 23.7,44
  pour cut-out: 20.74,34.063 20.74,16.438 18.74,16.438
  pour cut-out: 26.82,33.732 19.74,33.732 19.74,34.605
  pour cut-out: 21.152,40.947 21.152,36.89 19.542,36.89
  pour cut-out: 36.099,56.46 41.34,56.46 41.34,57.411
  pour cut-out: 74.696,54.577 74.696,54.277 76.396,54.277 76.396,54.577
  pour cut-out: 74.7,50.65 74.7,50.35 76.4,50.35 76.4,50.65
  pour cut-out: 23.55,45.7 23.55,44 24,44 24,45.7
  pour cut-out: 9.856,32.5 9.856,30.8 10.156,30.8 10.156,32.5
  pour cut-out: 9.856,30.352 9.856,28.652 10.156,28.652 10.156,30.352
  pour cut-out: 9.856,28.204 9.856,26.504 10.156,26.504 10.156,28.204
  pour cut-out: 9.856,26.056 9.856,24.356 10.156,24.356 10.156,26.056
  pour cut-out: 9.856,23.908 9.856,22.208 10.156,22.208 10.156,23.908
  pour cut-out: 9.856,21.76 9.856,20.06 10.156,20.06 10.156,21.76
  pour cut-out: 9.856,19.612 9.856,17.912 10.156,17.912 10.156,19.612
  pour cut-out: 9.856,17.464 9.856,15.764 10.156,15.764 10.156,17.464
  pour cut-out: 36.967,17.464 36.967,15.764 37.267,15.764 37.267,17.464
  pour cut-out: 36.967,19.612 36.967,17.912 37.267,17.912 37.267,19.612
  pour cut-out: 36.967,21.76 36.967,20.06 37.267,20.06 37.267,21.76
  pour cut-out: 36.967,23.908 36.967,22.208 37.267,22.208 37.267,23.908
  pour cut-out: 36.967,26.056 36.967,24.356 37.267,24.356 37.267,26.056
  pour cut-out: 36.967,28.204 36.967,26.504 37.267,26.504 37.267,28.204
  pour cut-out: 36.967,30.352 36.967,28.652 37.267,28.652 37.267,30.352
  pour cut-out: 36.967,32.5 36.967,30.8 37.267,30.8 37.267,32.5
  pour cut-out: 49.15,32.8 49.15,28.95 49.45,28.95 49.45,32.8
  pour cut-out: 50.798,16.098 52.66,16.098 52.66,14.4
  pour cut-out: 79.44,20.655 79.44,18.26 80.54,18.26
  pour cut-out: 80.395,21.9 82.6,21.9 82.6,20.32
  pour cut-out: 57.659,24.02 57.659,19.48 55.2,19.48
  pour cut-out: 52.515,23.12 55.2,23.12 55.2,22.02
  pour cut-out: 51.56,22.165 51.56,15.67 53.263,15.67
  pour cut-out: 81.64,46.345 81.64,43.66 80.54,43.66
  pour cut-out: 76.26,44.91 76.26,47.3 80.685,47.3
  pour cut-out: 77.855,34.94 75.75,34.94 75.75,36
  pour cut-out: 80.395,42.56 78,42.56 78,43.66
  pour cut-out: 79.1,43.805 79.1,36.04 78,36.04
  pour cut-out: 19.733,41.978 23.7,41.978 23.7,43.55
  pour cut-out: 19.74,41.97 17.79,41.97 17.79,40.7
  pour cut-out: 25.096,33.8 27.36,33.8 27.36,34.382
  pour cut-out: 49.15,32.8 49.15,28.95 47.55,28.95
  pour cut-out: 22.84,38.3 21.3,38.3 21.3,37.884
  pour cut-out: 37.505,63.82 39.9,63.82 39.9,62.72
  pour cut-out: 6.735,63.82 24.66,63.82 24.66,62.72
Bottom Layer:
  pour cut-out: 47.843,66.55 47.843,67.85 49,67.85
  pour cut-out: 6.201,32.5 9.056,32.5 9.056,31.85
  pour cut-out: 38.319,32.502 41.3,32.502 41.3,32.2
  pour cut-out: 38.45,39.25 38.45,38.789 40.35,38.789 40.35,39.25
  pour cut-out: 40.05,38.8 40.05,37.1 40.35,37.1 40.35,38.789
  pour cut-out: 40.05,40.95 40.05,39.25 40.35,39.25 40.35,40.95
  pour cut-out: 43.94,37.26 43.015,37.26 43.015,36.085
  pour cut-out: 69.52,66.697 69.52,65.2 70.44,65.2
  pour cut-out: 67.752,67.493 67.752,65.2 70.44,65.2
  pour cut-out: 70.592,64.046 70.592,62.66 67.9,62.66
  pour cut-out: 67.755,61.56 70.44,61.56 70.44,62.66
  pour cut-out: 67.748,64.046 67.748,62.66 70.44,62.66
  pour cut-out: 61.38,65.345 61.38,67.85 59.2,67.85
  pour cut-out: 20.68,65.405 20.68,62.72 19.58,62.72
  pour cut-out: 18.687,45.6 19.05,45.6 19.05,43.9 18.75,43.9
  pour cut-out: 32.75,59.793 34.05,59.793 34.05,57.08 32.75,57.08
  pour cut-out: 56.3,45.025 56.3,42.34 55.2,42.34
  pour cut-out: 74.55,39.25 74.55,37.55 74.85,37.55 74.85,39.25
  pour cut-out: 32.463,51.75 36.26,51.75 36.26,52.323
  pour cut-out: 33.2,55.15 33.2,54.85 34.9,54.85 34.9,55.15
  pour cut-out: 31.05,53.65 31.05,53.35 32.75,53.35 32.75,53.65
  pour cut-out: 33.2,59.1 33.2,58.8 34.9,58.8 34.9,59.1
  pour cut-out: 21.328,51.38 22.623,51.38 22.623,52.28
  pour cut-out: 20.31,57.434 20.31,52.28 21.245,52.28
  pour cut-out: 19.725,61.62 17.04,61.62 17.04,62.72
  pour cut-out: 19.731,67.831 19.731,65.26 17.04,65.26
  pour cut-out: 19.58,65.26 19.58,62.72 17.04,62.72
  pour cut-out: 15.94,65.405 15.94,62.72 17.04,62.72
  pour cut-out: 61.38,65.345 61.38,62.66 60.28,62.66
  pour cut-out: 54.1,65.345 54.1,61.75 55.25,61.75
  pour cut-out: 55.282,66.3 60.28,66.3 60.28,65.186
  pour cut-out: 27.36,36.89 23.9,36.89 23.9,34.4
  pour cut-out: 18.5,14.488 18.5,16.57 20.046,16.57
  pour cut-out: 4.301,32.5 4.301,15.714 11.756,15.714
  pour cut-out: 42.817,32.5 42.817,15.764 35.367,15.764
  pour cut-out: 36.967,30.352 37.267,30.352 37.267,28.652 36.967,28.652
  pour cut-out: 40.917,32.5 41.217,32.5 41.217,30.8 40.917,30.8
  pour cut-out: 36.967,30.8 37.267,30.8 37.267,32.1 36.95,32.1
  pour cut-out: 46.9,49.75 47.343,49.75 47.343,49.3 46.9,49.3
  pour cut-out: 46.9,51.8 46.9,51.45 50.4,51.45 50.4,51.8
  pour cut-out: 48.5,51.45 48.5,49.75 48.8,49.75 48.8,51.45
  pour cut-out: 48.5,53.5 48.5,51.8 48.8,51.8 48.8,53.5
  pour cut-out: 36.913,47.082 38.75,47.082 38.75,46.583
  pour cut-out: 26.36,31.942 26.36,30.893 26.948,30.893
  pour cut-out: 26.36,31.678 26.36,33.05 27.505,33.05
  pour cut-out: 20.74,34.482 20.74,35.6 18.49,35.6
  pour cut-out: 9.856,32.5 9.856,30.8 10.156,30.8 10.156,32.5
  pour cut-out: 9.856,30.302 9.856,28.602 10.156,28.602 10.156,30.302
  pour cut-out: 9.856,28.154 9.856,26.454 10.156,26.454 10.156,28.154
  pour cut-out: 9.856,26.006 9.856,24.306 10.156,24.306 10.156,26.006
  pour cut-out: 9.856,23.858 9.856,22.158 10.156,22.158 10.156,23.858
  pour cut-out: 9.856,21.71 9.856,20.01 10.156,20.01 10.156,21.71
  pour cut-out: 9.856,19.562 9.856,17.862 10.156,17.862 10.156,19.562
  pour cut-out: 9.856,17.414 9.856,15.714 10.156,15.714 10.156,17.414
  pour cut-out: 5.901,17.414 5.901,15.714 6.201,15.714 6.201,17.414
  pour cut-out: 5.901,19.562 5.901,17.862 6.201,17.862 6.201,19.562
  pour cut-out: 5.901,21.71 5.901,20.01 6.201,20.01 6.201,21.71
  pour cut-out: 5.901,23.858 5.901,22.158 6.201,22.158 6.201,23.858
  pour cut-out: 5.901,26.006 5.901,24.306 6.201,24.306 6.201,26.006
  pour cut-out: 5.901,28.154 5.901,26.454 6.201,26.454 6.201,28.154
  pour cut-out: 5.901,30.302 5.901,28.602 6.201,28.602 6.201,30.302
  pour cut-out: 5.901,32.5 5.901,30.8 6.201,30.8 6.201,32.5
  pour cut-out: 60.28,65.2 60.28,61.55 56.63,61.55
  pour cut-out: 40.35,39.678 40.35,37.9 41.404,37.9
  pour cut-out: 21.21,57.36 21.21,56.423 22.623,56.423
  pour cut-out: 21.21,47.2 21.21,48.1 22.65,48.1
  pour cut-out: 44.5,55.25 39.1,55.25 39.1,58.593
  pour cut-out: 36.378,51.38 38.5,51.38 38.5,54.05
  pour cut-out: 41.34,52.28 44.5,52.28 44.5,55.25
  pour cut-out: 41.34,52.28 41.34,54.82 43.65,54.45
  pour cut-out: 52.805,41.24 55.2,41.24 55.2,42.34
  pour cut-out: 52.515,45.98 55.2,45.98 55.2,44.88
  pour cut-out: 51.617,42.697 51.617,44.88 52.66,44.88
  pour cut-out: 49.15,43.25 49.45,43.25 49.45,41.55 49.15,41.55
  pour cut-out: 28.36,16.702 28.36,14.03 27.36,14.03
  pour cut-out: 14.355,5.72 32.28,5.72 32.28,6.82
  pour cut-out: 19.126,13.691 19.126,11.85 19.955,11.85
  pour cut-out: 19.872,15.03 21.5,15.03 21.5,13.82
  pour cut-out: 36.167,31.65 37.267,31.65 37.267,33.05
  pour cut-out: 28.36,35.957 28.36,33.05 26.65,33.05
  pour cut-out: 26.3,35.6 23.9,35.6 23.9,34.4
  pour cut-out: 28.36,39.562 28.36,35.6 26.88,35.6
  pour cut-out: 26.36,39.562 26.36,35.6 27.4,35.6
  pour cut-out: 18.5,40.75 18.5,33.35 19.872,33.35
  pour cut-out: 22.781,37.1 23.9,37.1 23.9,37.95
  pour cut-out: 22.055,40 23.6,40 23.6,37.413
  pour cut-out: 8.3,42.104 8.3,39.5 8.95,39.5

## Silkscreen, mask and mechanical layers (free items; w line width, h text height)
Top Overlay:
  rectangle: 13.169,5.53 33.45,8.07
  rectangle: 5.63,61.39 25.95,63.967
  region: 9.673,56.016 10.95,57.2 11.95,57.2 12.245,56.905 12.245,54 cw(c11.779,54) 11.779,53.534 10.141,53.534 cw(c10.141,53.988) 9.686,53.985
  region: 10.2,57.2 cw(c10.804,56.596) 10.804,57.45 11.096,57.45 cw(c11.096,56.596) 11.7,57.2
  region: 10.128,53.533 11.79,53.534 cw(c11.79,53.095) 12.229,53.095 12.229,50.174 cw(c11.801,50.174) 11.801,49.746 10.063,49.746 cw(c10.063,50.12) 9.689,50.12 9.689,53.095 cw(c10.127,53.095)
  region: 10.152,49.748 11.766,49.748 cw(c11.766,49.285) 12.229,49.285 12.229,46.237 cw(c11.848,46.237) 11.848,45.856 10.07,45.856 cw(c10.07,46.237) 9.689,46.237 9.689,49.285 cw(c10.152,49.285)
  region: 10.2,57.2 10.95,57.95
  lines w0.2: 8.673,55 9.673,55 ; 8.673,56.905 9.673,56.905 ; 8.689,47.167 9.689,47.167 ; 8.689,49.199 9.689,49.199 9.689,46.278 8.925,46.278 ; 8.689,51.063 9.689,51.063 ; 8.689,53.095 9.689,53.095 9.689,50.174 8.975,50.174 ; 8.925,48.183 9.689,48.183 ; 8.925,52.079 9.689,52.079 ; 8.925,53.984 9.673,53.984 ; 8.925,56.016 9.673,56.016 ; 9.687,53.984 9.673,56.905 ; 10.2,57.2 cw(c10.95,56.2) 11.7,57.2 ; 10.27,57.593 10.467,57.397 ; 11.485,57.408 11.699,57.622 ; 12.229,47.294 13.229,47.294 ; 12.229,48.31 12.925,48.31 ; 12.229,51.19 13.229,51.19 ; 12.229,52.206 12.925,52.206 ; 12.231,53.984 12.245,56.905 ; 12.245,53.984 12.925,53.984 ; 12.245,55 13.245,55 ; 12.245,56.016 12.925,56.016 ; 12.875,50.174 12.229,50.174 12.229,53.095 13.229,53.095 ; 12.925,46.278 12.229,46.278 12.229,49.199 13.229,49.199 ; 13.245,56.905 12.245,56.905 ; 9.673,56.905 9.95,57.2 11.95,57.2 12.245,56.905
  text "IO0_2" at 19.643,66.565 h0.6 r45
  text "IO0_1" at 22.214,66.565 h0.6 r45
  text "IO0_0" at 24.678,66.565 h0.6 r45
  text "IO0_7" at 5.493,58.265 h0.6 r45
  text "IO0_6" at 8.043,58.265 h0.6 r45
  text "IO0_5" at 10.543,58.265 h0.6 r45
  text "IO0_4" at 13.093,58.265 h0.6 r45
  text "IO0_3" at 15.593,58.265 h0.6 r45
  text "INT" at 6.673,56.65 h0.6
  text "VDD" at 13.764,56.655 h0.6
  text "A1" at 7.373,55.65 h0.6
  text "SDA" at 13.764,55.655 h0.6
  text "RESET" at 5.373,54.65 h0.6
  text "SCL" at 13.764,54.655 h0.6
  text "IO0_0" at 5.473,53.7 h0.6
  text "A0" at 13.764,53.655 h0.6
  text "IO1_7" at 13.764,52.882 h0.6
  text "IO0_1" at 5.673,52.877 h0.6
  text "VDD PCA" at 69.5,52.85 h0.6
  text "IO0_2" at 5.473,51.877 h0.6
  text "IO1_6" at 13.764,51.882 h0.6
  text "IO0_3" at 5.473,50.877 h0.6
  text "IO1_5" at 13.764,50.882 h0.6
  text "IO0_4" at 5.473,49.877 h0.6
  text "IO1_4" at 13.764,49.882 h0.6
  text "LEDS OFF/ON" at 29.151,49.2 h0.6
  text "SDA & SCL FK/MC" at 43.887,49.2 h0.6
  text "IO0_5" at 5.473,48.981 h0.6
  text "IO1_3" at 13.764,48.986 h0.6
  text "VDD MC" at 69.45,48.9 h0.6
  text "IO0_6" at 5.473,47.981 h0.6
  text "IO1_2" at 13.764,47.986 h0.6
  text "IO0_7" at 5.473,46.981 h0.6
  text "IO1_1" at 13.764,46.986 h0.6
  text "IO1_0" at 13.764,45.986 h0.6
  text "VSS" at 6.573,45.931 h0.6
  text "M1-SPI-ATM64 (V2)" at 66.569,20.551 h5 r90
  text "ИЛ1381ТО1/1" at 58.379,8.403 h6
  text "IO1_1" at 29.879,8.172 h0.6 r45
  text "IO1_4" at 22.217,8.134 h0.6 r45
  text "IO1_7" at 14.508,8.101 h0.6 r45
  text "IO1_6" at 17.13,8.105 h0.6 r45
  text "IO1_5" at 19.608,8.101 h0.6 r45
  text "IO1_3" at 24.708,8.101 h0.6 r45
  text "IO1_2" at 27.258,8.101 h0.6 r45
  text "IO1_0" at 32.308,8.101 h0.6 r45
  text "PCA9539PW" at 57.051,3.021 h6
Bottom Overlay:
  text "ИЛ1381ТО1/1" at 82.16,7.421 h4
  text "PCA9539PW" at 82.145,2.319 h5
Board:
  the board outline again, w0.2

## Dimensions
85,0 to 85,70 on Dimensions
0,0 to 85,0 on Dimensions

## Text inside footprints (layer, text, board x,y; h text height)
D2: Top Overlay "TSSOP-24 to DIP-7.62" at 25.896,17.734 h3 r90
K1: Bottom Overlay "-" at 36.69,48.43 h1 r90; Bottom Overlay "+" at 42,48.28 h1 r90
K2: Bottom Overlay "-" at 21.64,48.43 h1 r90; Bottom Overlay "+" at 26.95,48.28 h1 r90